# Altium PCB Owens Test Node.PcbDoc
Units mm, origin at the board's own origin, x right, y up, seen from the top; angles counter-clockwise.
Board outline 50.75 x 50 mm, 4 copper layers (Top Layer, GND, 3.3V, Bottom Layer), stack 0.603 mm thick; 21 components, 22 nets, 80 pads, 21 vias.
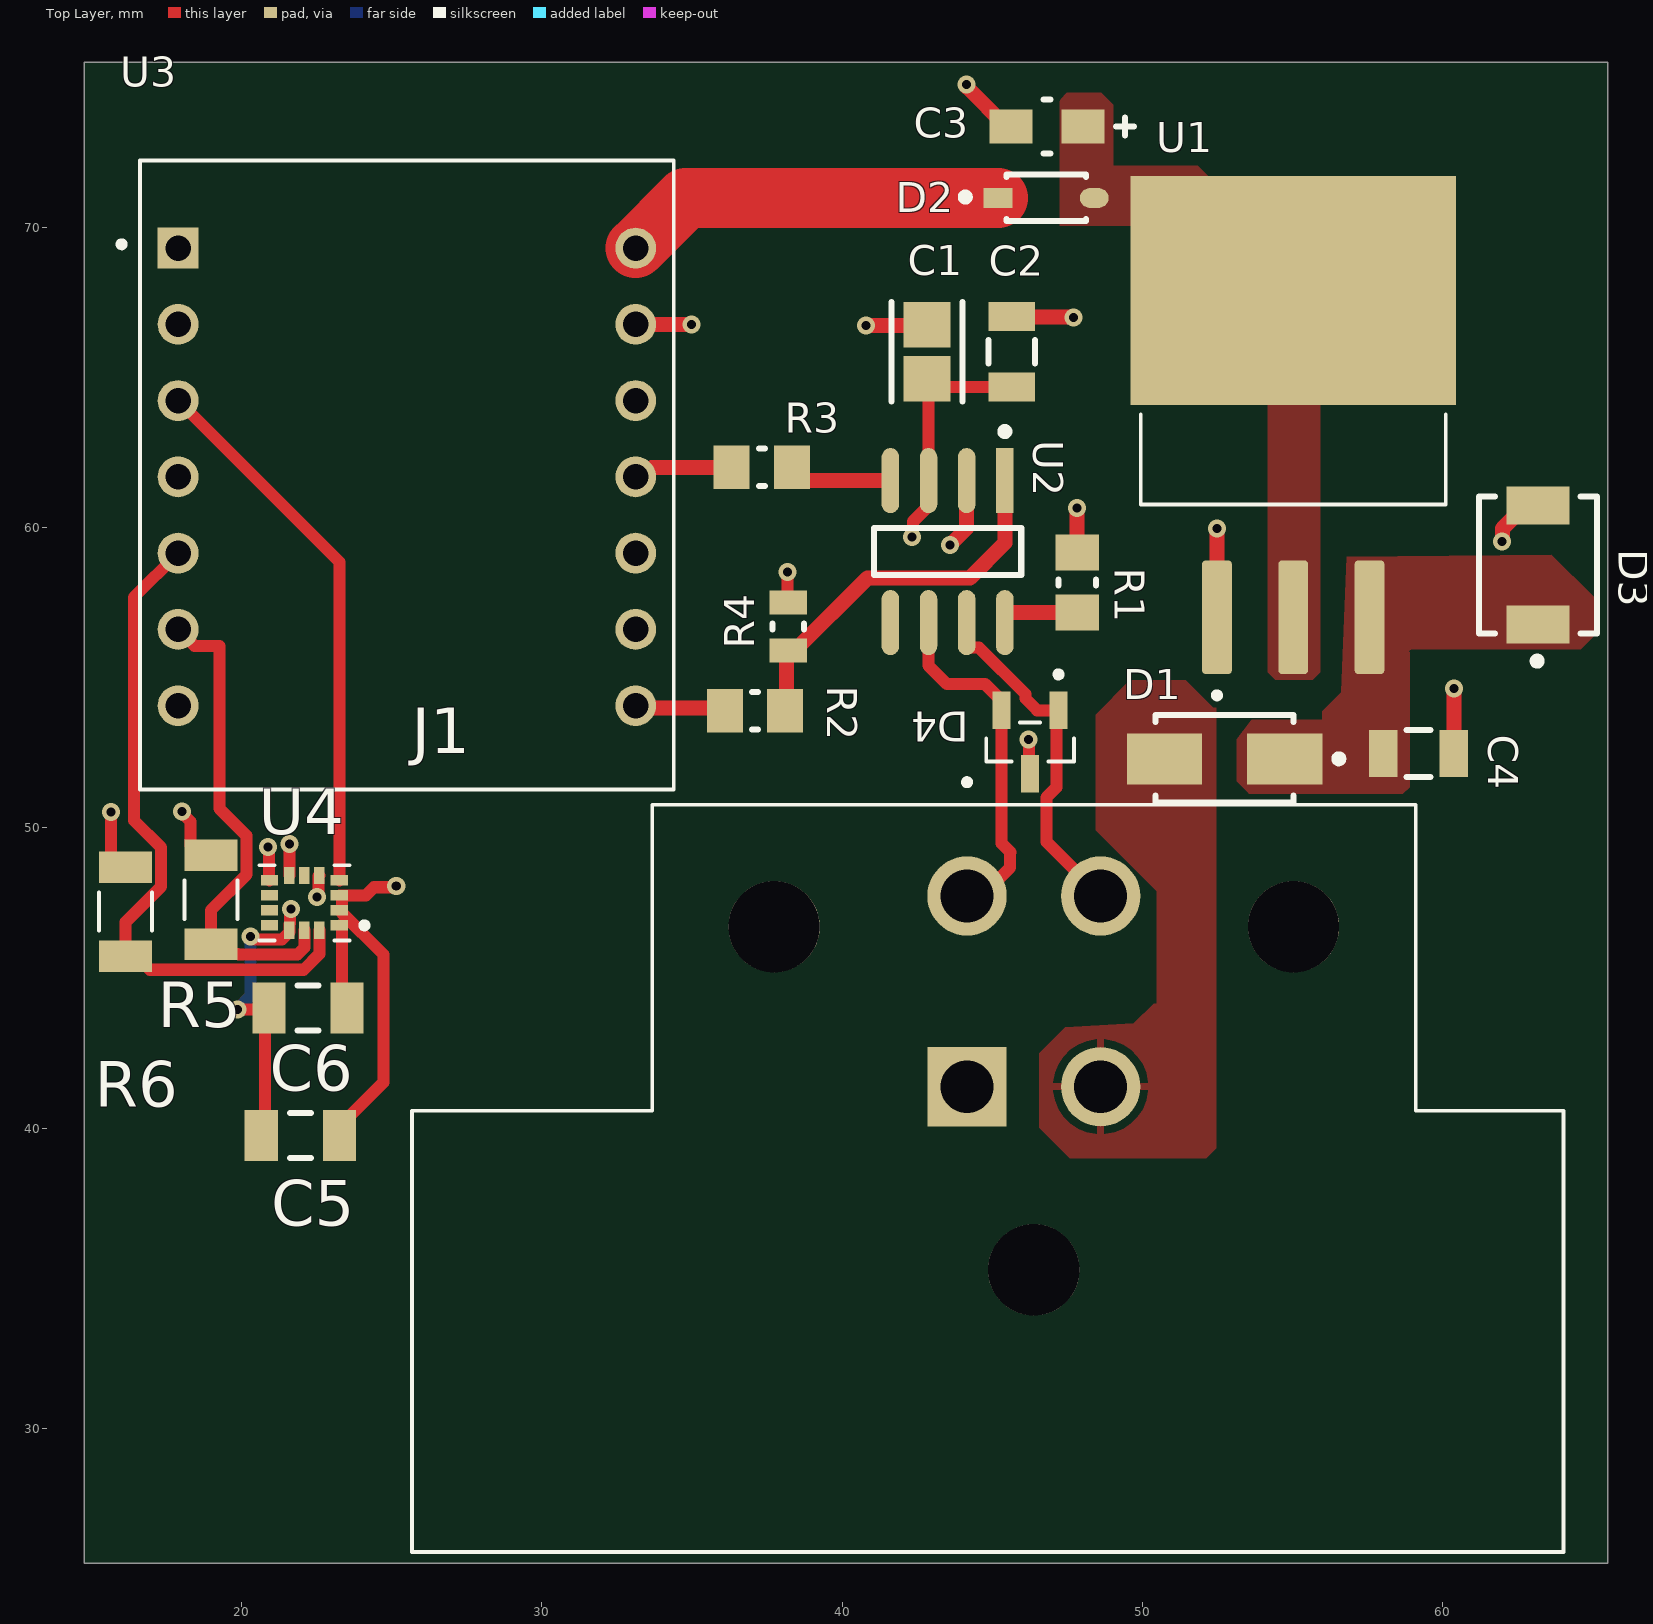
[diagram p0: Top Layer view]
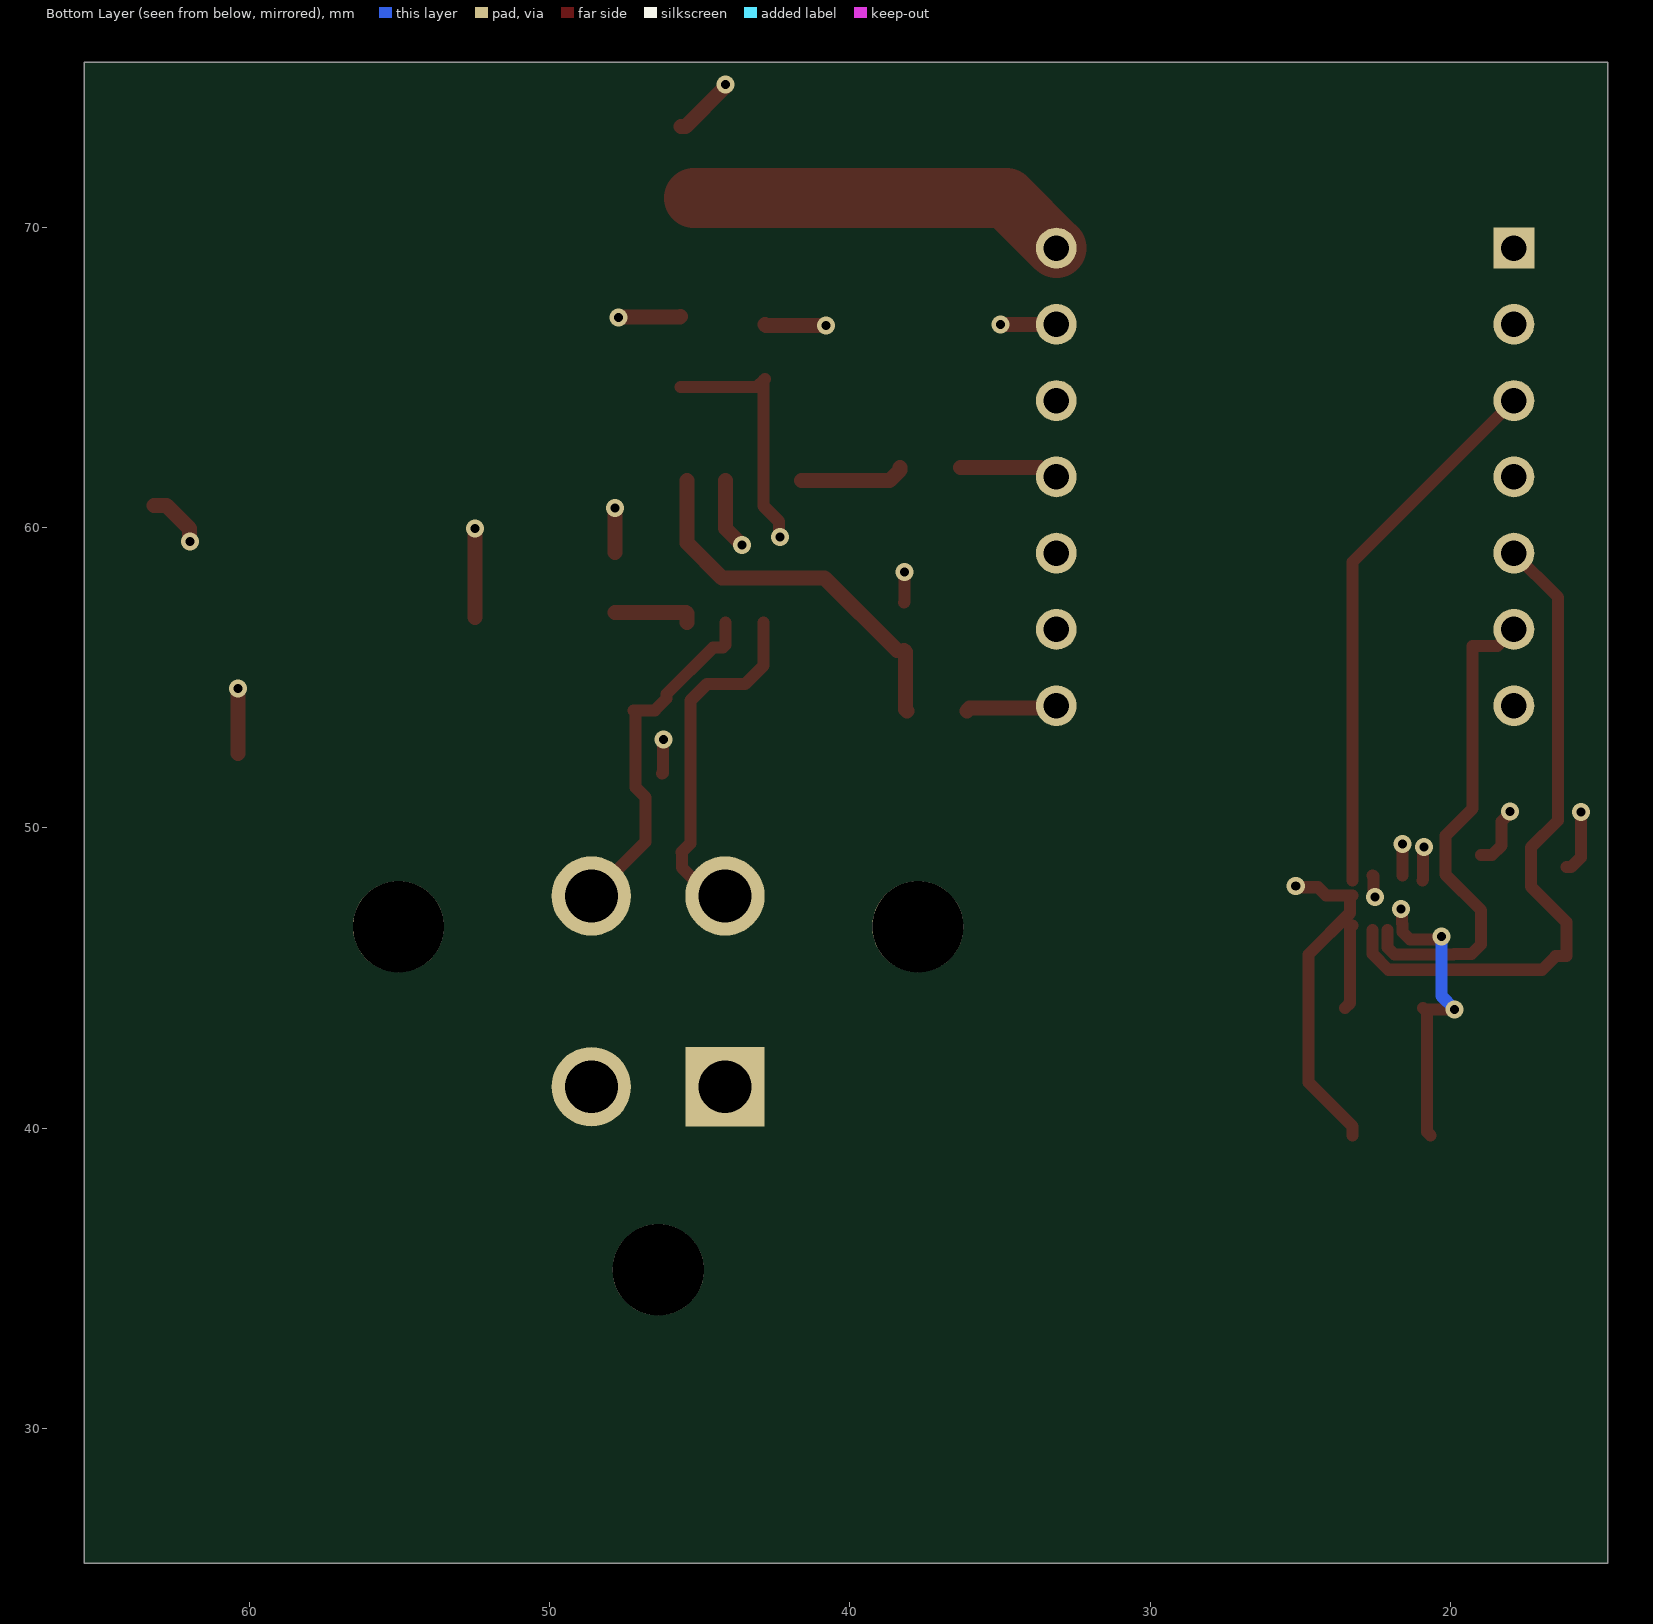
[diagram p1: Bottom Layer view, seen from below]
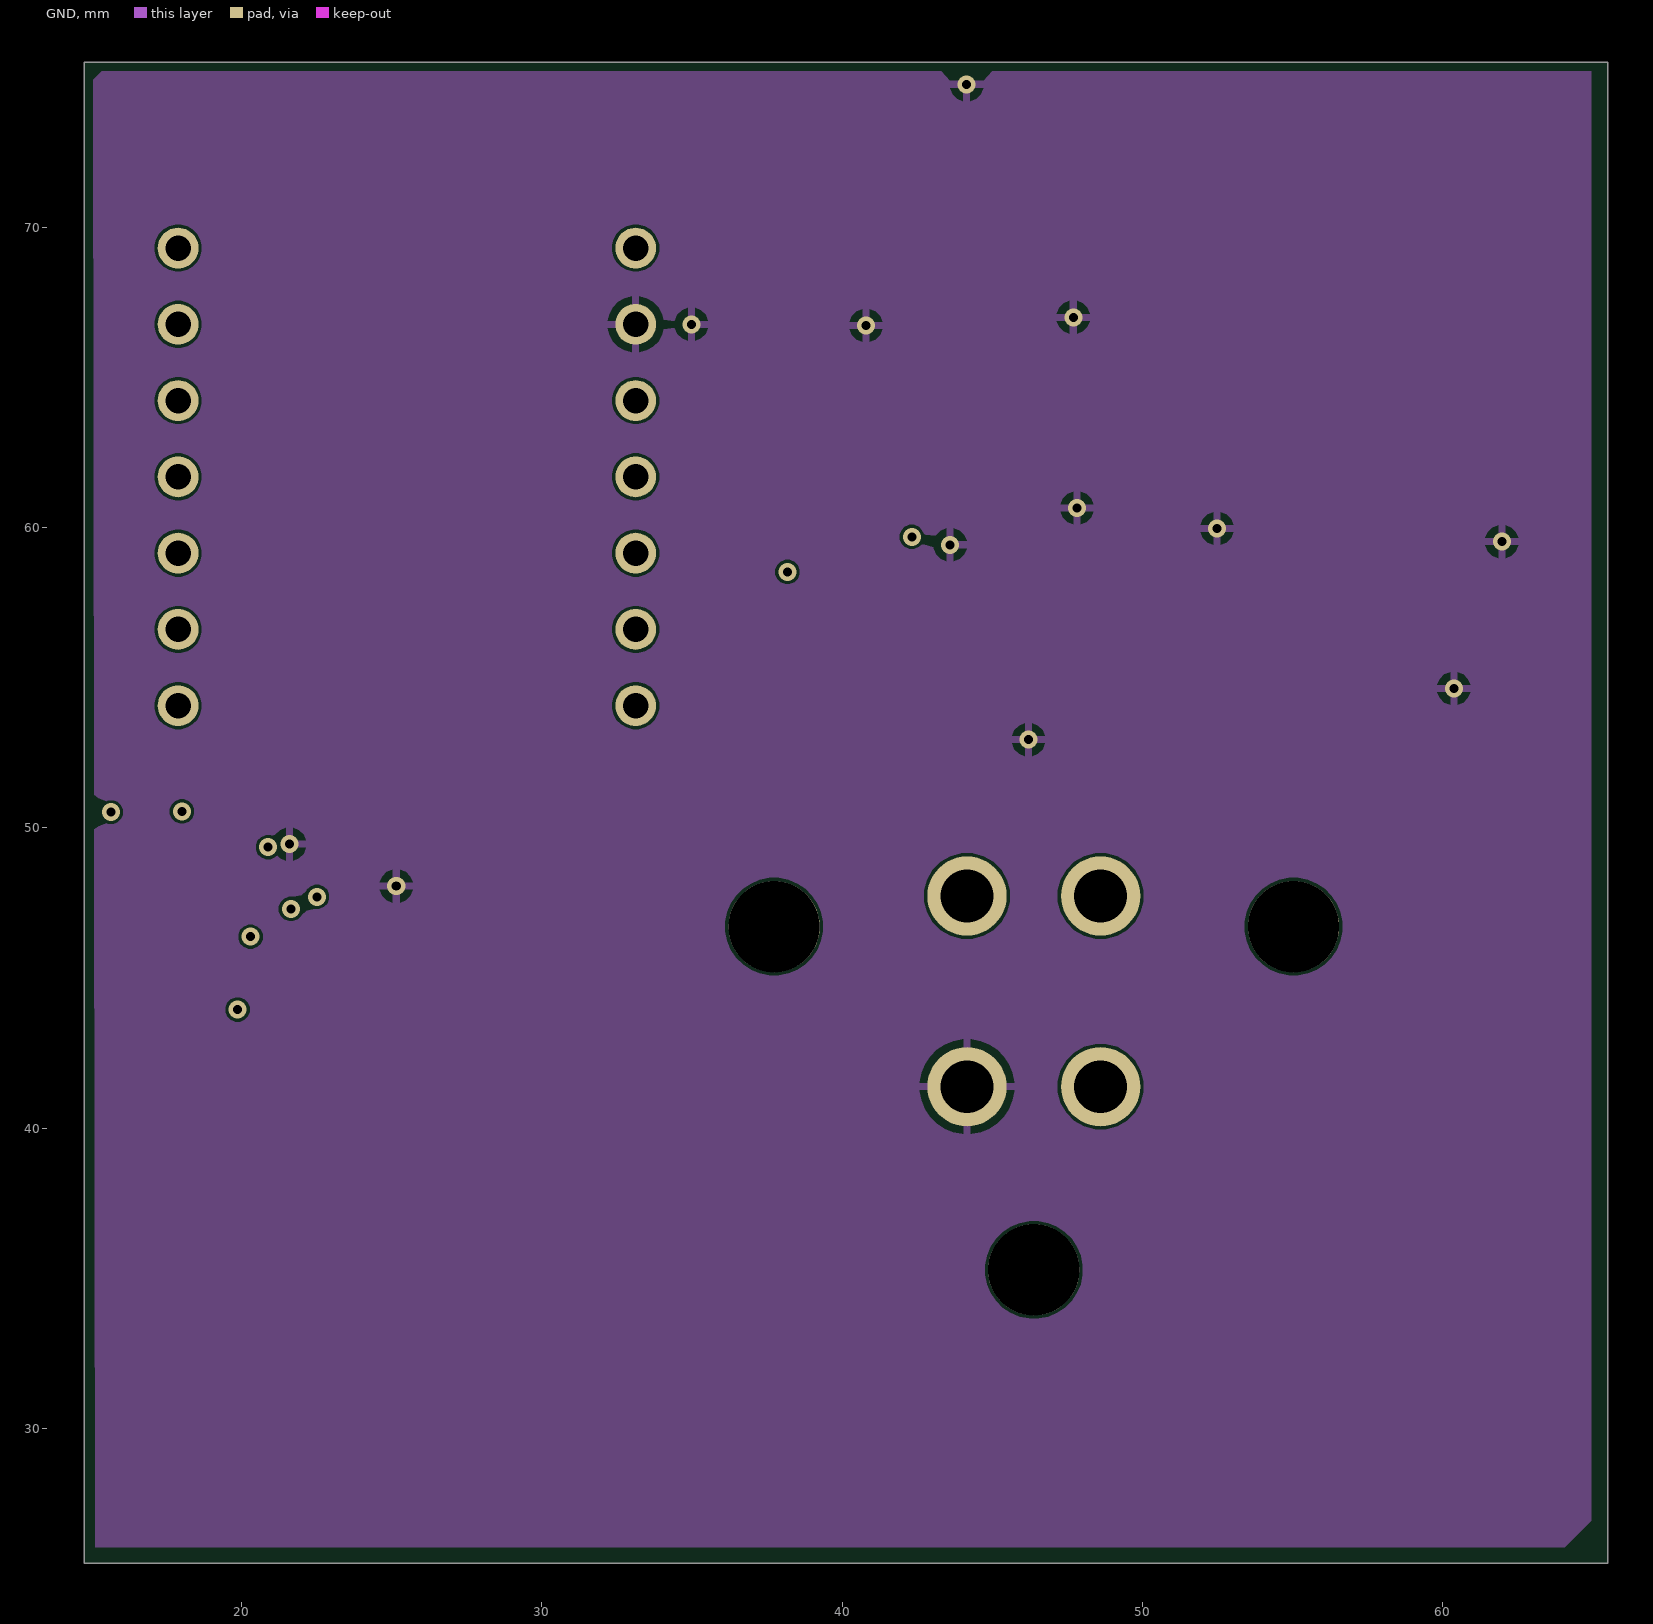
[diagram p2: GND]
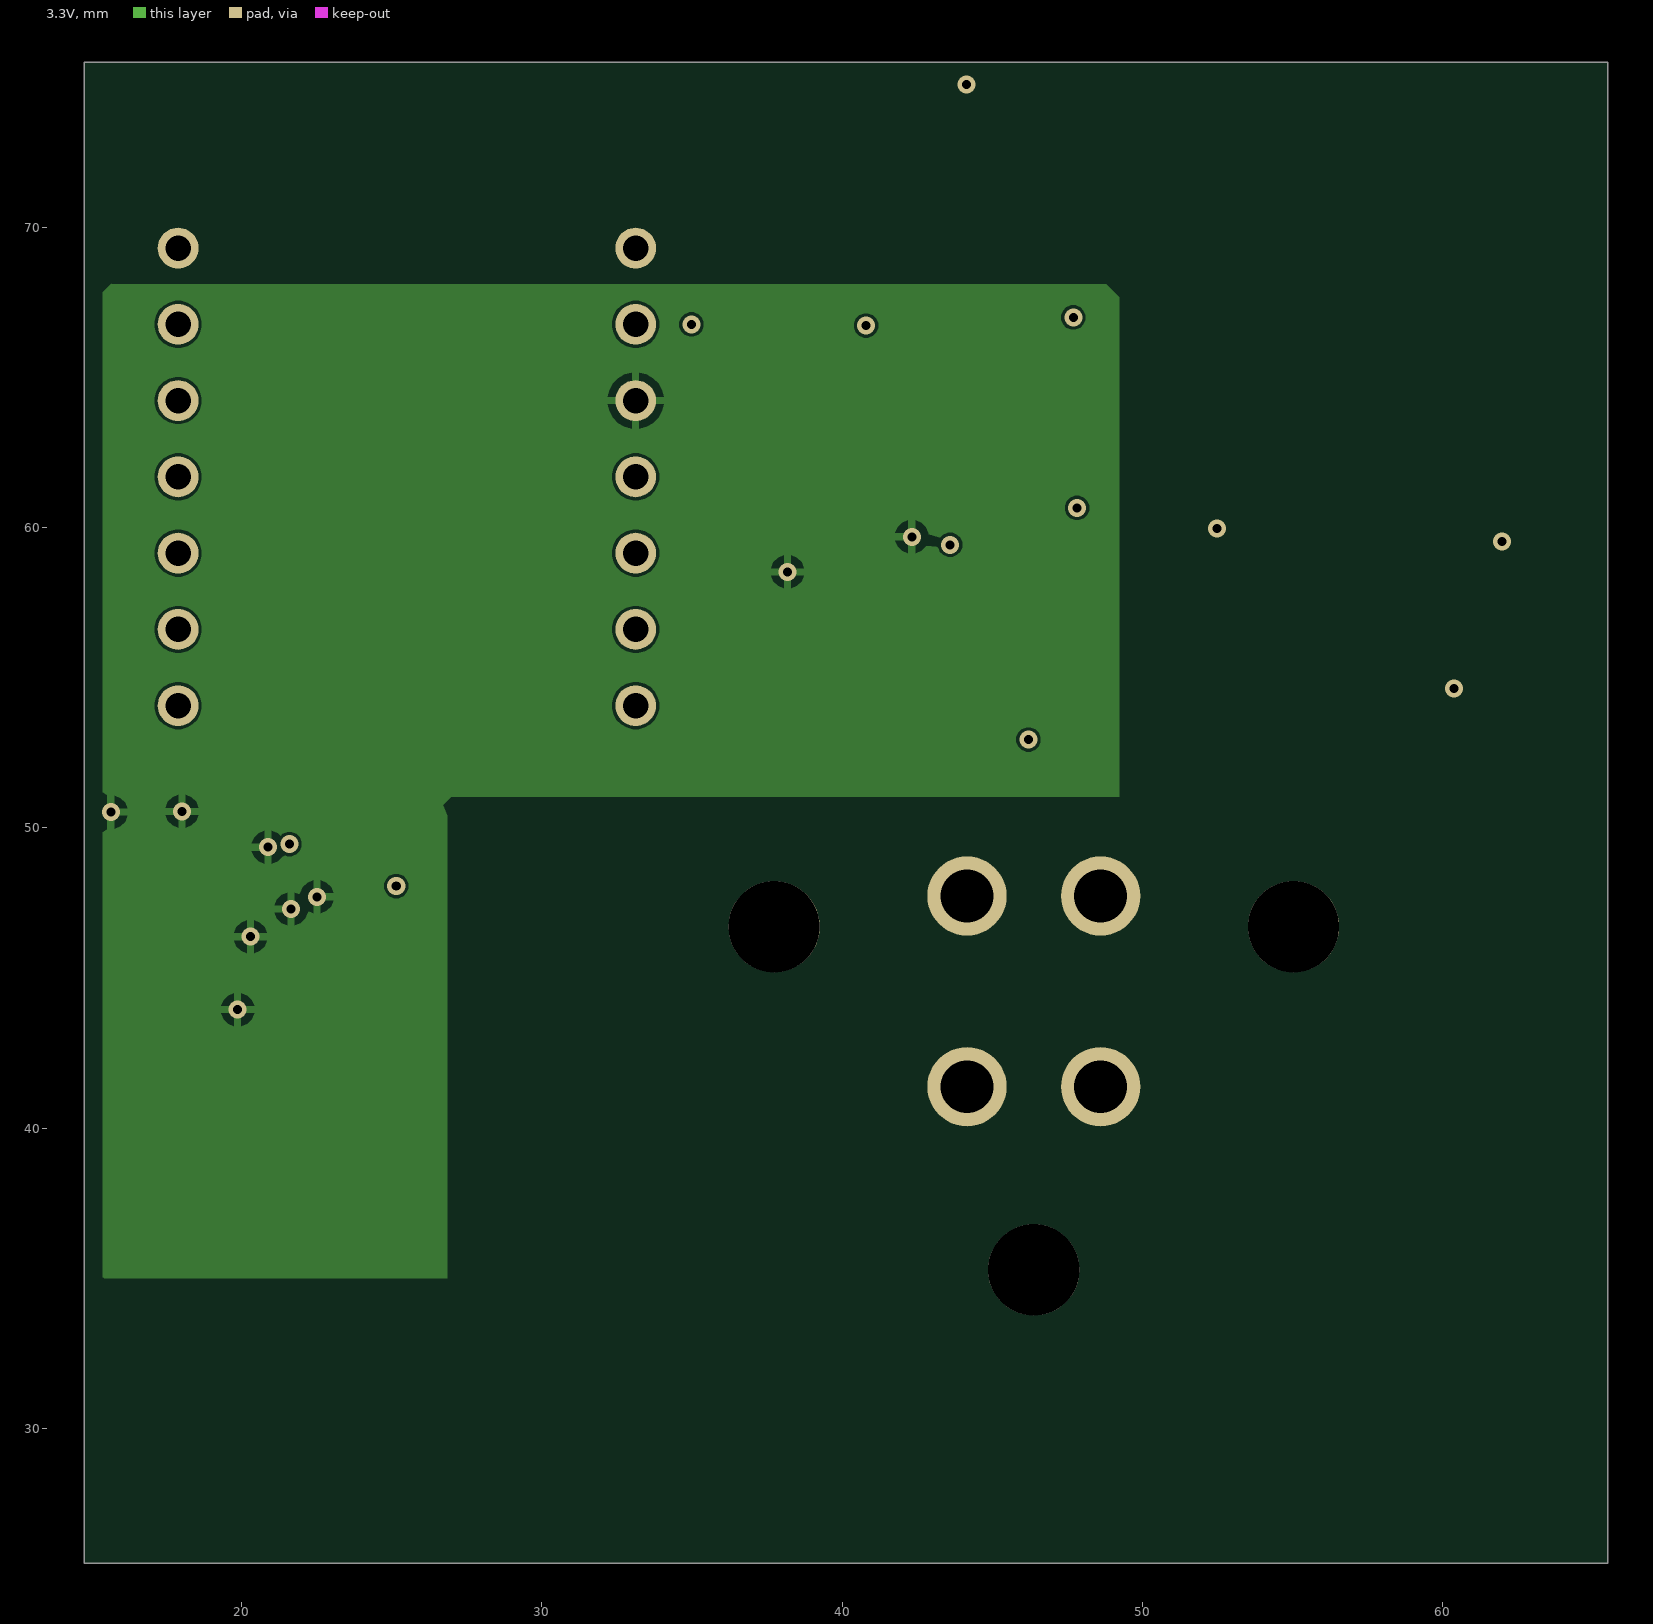
[diagram p3: 3.3V]
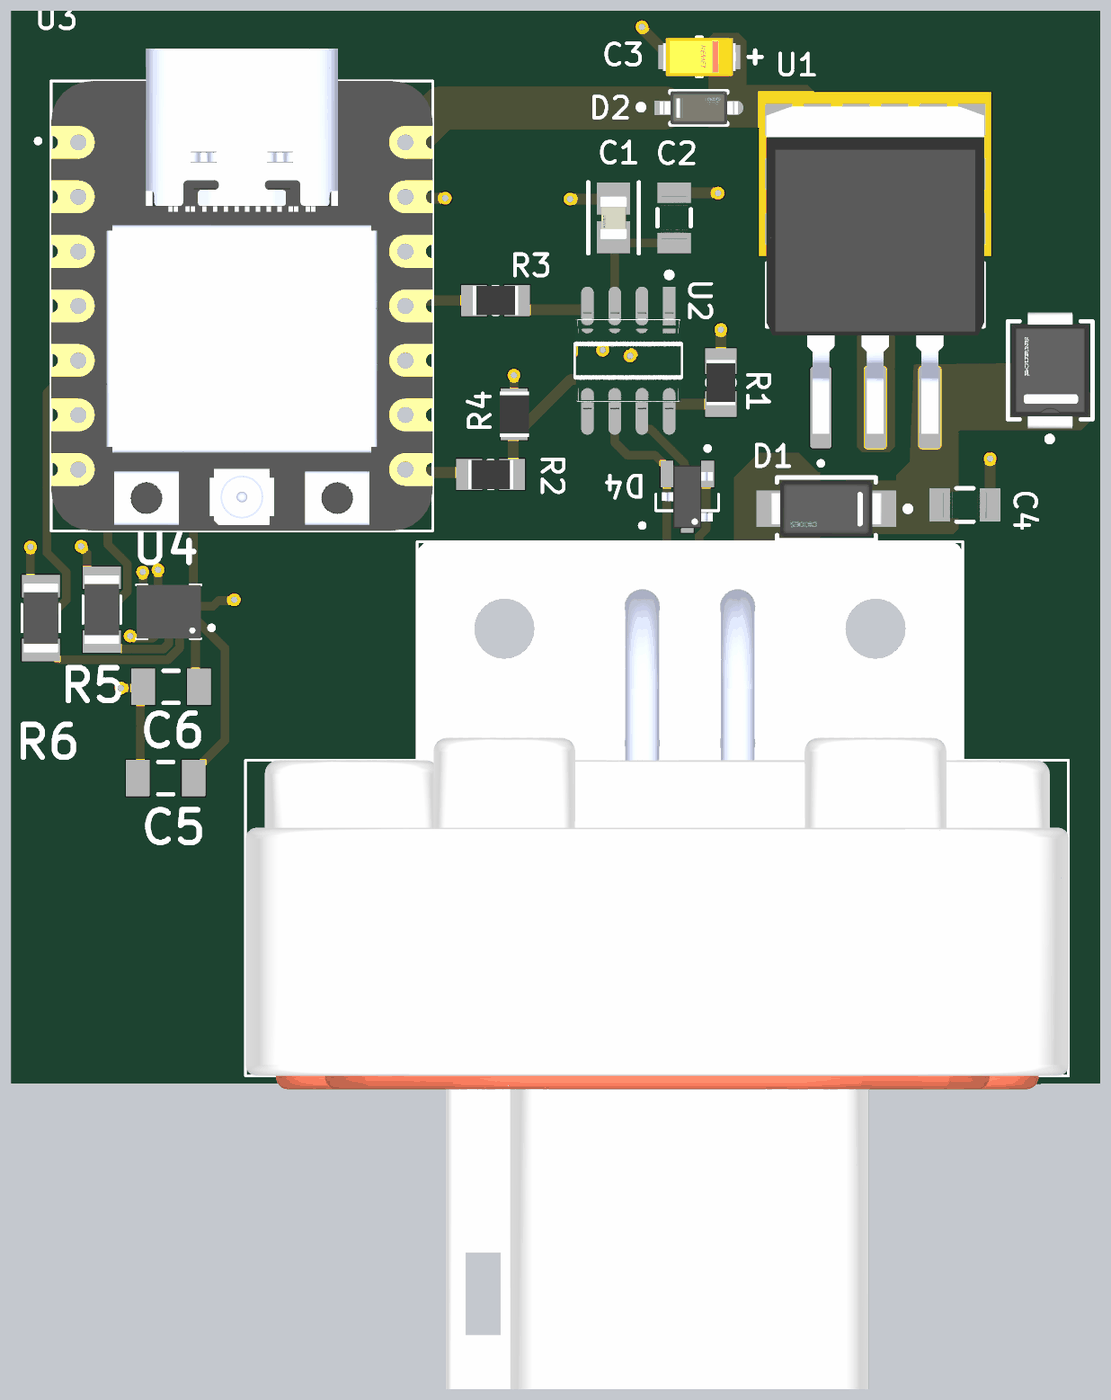
[diagram p4: 3D render of the assembled board from above, using the file's embedded part models]

## Layer stack, top to bottom
Top Solder: solder mask 0.0102, Solder Resist, Dk 3.5
Top Layer: signal copper 0.0356
Dielectric 2: prepreg 0.0711, PP-006, Dk 4.1
GND: signal copper 0.035
Dielectric 1: dielectric 0.32, FR-4, Dk 4.8
3.3V: signal copper 0.035
Dielectric 3: prepreg 0.0711, PP-006, Dk 4.1
Bottom Layer: signal copper 0.0356
Bottom Solder: solder mask 0.0102, Solder Resist, Dk 3.5

## Board outline
14.75,25.5 14.75,75.5 65.5,75.5 65.5,25.5

## Design rules (kind name [scope] priority, off if disabled: settings)
BoardOutlineClearance [All] p1: gap=0.3 ignorepadtopadclearanceinfootprint=FALSE
Clearance [All] p1: gap=0.1 ignorepadtopadclearanceinfootprint=FALSE
HoleSize [All] p1: absolutevalues=TRUE maxlimit=6.3 minlimit=0.3 maxpercent=80.000 minpercent=20.000
MinimumAnnularRing [All] p1: minimumring=0.13
MinimumSolderMaskSliver [All] p1: minsoldermaskwidth=0.2
PolygonConnect [All] p1: thpad.connectstyle=Relief thpad.reliefconductorwidth=0.254 thpad.reliefentries=4 thpad.polygonreliefangle="90 Angle" thpad.airgapwidth=0.254 smdpad.connectstyle=Direct smdpad.reliefconductorwidth=0.254 smdpad.reliefentries=4 smdpad.polygonreliefangle="90 Angle" smdpad.airgapwidth=0.254 via.connectstyle=Relief via.reliefconductorwidth=0.254 via.reliefentries=4 via.polygonreliefangle="90 Angle" via.airgapwidth=0.254
RoutingVias [All] p1: holewidth=0.3 width=0.6 viastyle="Through Hole" minholewidth=0.3 minwidth=0.6 maxholewidth=0.3 maxwidth=0.6
SilkToSilkClearance [All] p1: silktosilkclearance=0.15
SilkToSolderMaskClearance [IsPad] p1: minsilkscreentomaskgap=0.05 clearancetoexposedcopper=TRUE
SolderMaskExpansion [All] p1: expansion=0.05 istentingtop=FALSE
SupplyNets "Schematic Supply Nets_3" [InNet('+12')] p1: voltage=0.000
SupplyNets "Schematic Supply Nets_2" [InNet('+3.3')] p2: voltage=0.000
SupplyNets "Schematic Supply Nets_1" [InNet('GND')] p3: voltage=0.000
SupplyNets "Schematic Supply Nets" [InNet('+5')] p4: voltage=0.000
Width Power [All] p1: maxlimit=2 minlimit=0.4 preferedwidth=0.5
Width [All] p2: maxlimit=2 minlimit=0.09 preferedwidth=0.25
26 further rules are at their usual default settings.

## Classes and differential pairs
component class U_Sheet1: C1 C2 C3 C4 D1 D2 D3 D4 R1 R2 R3 R4 U1 U2 U3
component class U_Accel: C5 C6 R5 R6 U4
component class "Owens Test Node": J1

## Components (designator, comment, footprint, x,y, rotation, side; value= is the part's Value field where it differs from the comment)
C1 "C0805C104K5RACTU" FP-C0805C-DN-IPC_A 42.819,65.853 r90 top value=100nF
C2 "CGA4J1X7S1E106K125AE" FP-CGA4J-IPC_A 45.644,65.853 r90 top value=10µF
C3 "T491A106K016AT" FP-T491A106K016AT-MFG 46.819,73.35 r0 top value=10µF
C4 "CGA4J1X7S1E106K125AE" FP-CGA4J-IPC_A 59.194,52.475 r0 top value=10µF
C5 "C1206C104K5RACTU" KEMT-1206-2_L 21.95,39.75 r0 top value=100nF
C6 "C1206C104K5RACTU" KEMT-1206-2_L 22.2,44 r0 top value=100nF
D1 "B340A-13-F" FP-SMA-MFG 52.737,52.296 r180 top
D2 "1N5819HW-7-F" FP-SOD123-IPC_C 46.792,70.975 r0 top
D3 "SMBJ15A" FP-SMBJ-MFG 63.169,58.75 r90 top
D4 "ESD2CAN24DBZRQ1" SOT95P237X112-3N 46.253,52.857 r270 top
J1 "DT13-4P" TE_DT13-4P 46.38,41.377 r90 top
R1 "Resistor 0R +/- 5% 0805 125 mW" RESC2013X60X35ML10T20 47.821,58.175 r270 top value=0
R2 "Resistor 0R +/- 5% 0805 125 mW" RESC2013X60X35ML10T20 37.094,53.896 r0 top value=0
R3 "Resistor 0R +/- 5% 0805 125 mW" RESC2013X60X35ML10T20 37.319,62 r0 top value=0
R4 "RC0805FR-0710KL" RESC2013X60X35LL10T20 38.194,56.7 r90 top value=10k
R5 "RCS120610K0FKEA" RESC3116X65N 18.974,47.6 r90 top value=10k
R6 "RCS120610K0FKEA" RESC3116X65N 16.129,47.207 r90 top value=10k
U1 "LM1084ISX-5.0/NOPB" TO254P1524X483-4N 55.02,63.411 r90 top
U2 "SN65HVD230DR" FP-D0008A-IPC_B 43.509,59.197 r270 top
U3 "XIAO_ESP32C3" MODULE_XIAO_ESP32C3 25.5,61.75 r0 top
U4 "ASM330LHHXTR" XDCR_ASM330LHHXTR 22.087,47.5 r180 top

## Footprints (in the part's own frame and the unit in brackets; to place one, negate y for a bottom-side part, rotate by r counter-clockwise, add the part's x,y. Pads: shape width x height; smd on the part's side, far side on the other; paste and mask are expansions set on the pad)
FP-C0805C-DN-IPC_A [mm]
  rect 1.505x1.556 smd paste+0 mask+0: 1(-0.901,0) 2(0.901,0)
  silkscreen extent -1.65,-1.18 1.65,1.18, body extent -2.15,-1.28 2.15,1.28, height 0.25
FP-CGA4J-IPC_A [mm]
  rect 0.956x1.556 smd paste+0 mask+0: 1(-1.175,0) 2(1.175,0)
  silkscreen extent -0.4,-0.78 0.4,0.78, body extent -2.15,-1.28 2.15,1.28, height 0.25
FP-D0008A-IPC_B [mm]
  rect 2.169x0.582 smd paste+0 mask+0: 1(-2.364,1.905)
  rrect100% 2.169x0.582 smd paste+0 mask+0: 2(-2.364,0.635) 3(-2.364,-0.635) 4(-2.364,-1.905) 5(2.364,-1.905) 6(2.364,-0.635) 7(2.364,0.635) 8(2.364,1.905)
  silkscreen extent -4.12,-2.45 0.78,2.45, body extent -3.7,-2.7 3.7,2.7, height 0.25
FP-SMA-MFG [mm]
  rect 2.5x1.7 smd paste+0 mask+0: 1(-2,0) 2(2,0)
  silkscreen extent -3.93,-1.46 2.3,1.46, body extent -3.35,-1.56 3.35,1.56, height 0.25
FP-SMBJ-MFG [mm]
  rect 1.27x2.1 smd paste+0 mask+0: 1(-1.98,0) 2(1.98,0)
  silkscreen extent -3.32,-1.97 2.28,1.97, body extent -2.72,-2.07 2.72,2.07, height 0.25
FP-SOD123-IPC_C [mm]
  rect 0.957x0.662 smd paste+0 mask+0: 1(-1.6,0)
  rrect100% 0.957x0.662 smd paste+0 mask+0: 2(1.6,0)
  silkscreen extent -2.82,-0.77 1.33,0.77, body extent -2.18,-0.87 2.18,0.87, height 0.25
FP-T491A106K016AT-MFG [mm]
  rect 1.42x1.13 smd paste+0 mask+0: 1(-1.2,0) 2(1.2,0)
  silkscreen extent -0.12,-0.9 2.9,0.9, body extent -2.03,-1.02 2.03,1.02, height 0.25
KEMT-1206-2_L [mm] "SMD, 2-Leads, Body 3.4x1.8mm, IPC High Density"
  rect 1.1x1.7 smd: 1(-1.3,0) 2(1.3,0)
  silkscreen extent -0.35,-0.75 0.35,0.75, body extent -1.7,-0.9 1.7,0.9, height 0.88
MODULE_XIAO_ESP32C3 [mm]
  rect 1.358x1.358 / inner round 1.358 / far side rect 1.358x1.358 hole 0.85 mask+0.102: 1(-7.62,7.556)
  round 1.358 hole 0.85 mask+0.102: 2(-7.62,5.016) 3(-7.62,2.476) 4(-7.62,-0.064) 5(-7.62,-2.603) 6(-7.62,-5.143) 7(-7.62,-7.683) 8(7.62,-7.683) 9(7.62,-5.143) 10(7.62,-2.603) 11(7.62,-0.064) 12(7.62,2.476) 13(7.62,5.016) 14(7.62,7.556)
  silkscreen extent -9.6,-10.48 8.89,10.48, body extent -8.89,-10.48 8.89,11.99, height 4.21
RESC2013X60X35LL10T20 [mm] "Chip Resistor, 2-Leads, Body 2.1x1.35mm, IPC High Density"
  rect 0.8x1.25 smd: 1(-0.8,0) 2(0.8,0)
  silkscreen extent -0.1,-0.53 0.1,0.53, body extent -1.05,-0.67 1.05,0.68, height 0.6
RESC2013X60X35ML10T20 [mm] "Chip Resistor, 2-Leads, Body 2.1x1.35mm, IPC Low Density"
  rect 1.2x1.45 smd: 1(-1,0) 2(1,0)
  silkscreen extent -0.1,-0.63 0.1,0.63, body extent -1.05,-0.68 1.05,0.67, height 0.6
RESC3116X65N [mm]
  rect 1.05x1.77 smd: 1(-1.485,0) 2(1.485,0)
  silkscreen extent -0.64,-0.88 0.64,0.88, body extent -1.6,-0.8 1.6,0.8, height 0.65
SOT95P237X112-3N [mm]
  rect 1.24x0.59 smd: 1(-1.055,0.95) 2(-1.055,-0.95) 3(1.055,0)
  silkscreen extent -2.35,-1.46 0.65,1.46, body extent -1.18,-1.46 1.18,1.46, height 1.12
TE_DT13-4P [mm]
  round 2.64 hole 1.76: 1(6.35,2.225) 2(6.35,-2.225) 3(0,-2.225)
  rect 2.64x2.64 / inner round 2.64 / far side rect 2.64x2.64 hole 1.76: 4(0,2.225)
  round 3.04 hole 3.04 unplated: MH1(5.33,8.65) MH2(5.33,-8.65) MH3(-6.1,0)
  silkscreen extent -15.5,-17.64 10.24,20.71, body extent -30.1,-17.65 9.4,20.7, height 35.48
TO254P1524X483-4N [mm]
  rrect25% 3.79x0.99 smd: 1(-6.4,2.54) 2(-6.4,0) 3(-6.4,-2.54)
  rect 7.62x10.84 smd paste-6: 4(4.48,0)
  silkscreen extent -9.1,-5.08 0.35,5.08, body extent -7.62,-5.08 7.62,5.08, height 4.83
XDCR_ASM330LHHXTR [mm]
  rect 0.575x0.35 smd mask+0.05: 1(-1.162,0.75) 2(-1.162,0.25) 3(-1.162,-0.25) 4(-1.162,-0.75) 8(1.162,-0.75) 9(1.162,-0.25) 10(1.162,0.25) 11(1.162,0.75)
  rect 0.35x0.575 smd mask+0.05: 5(-0.5,-0.913) 6(0,-0.913) 7(0.5,-0.913) 12(0.5,0.913) 13(0,0.913) 14(-0.5,0.913)
  silkscreen extent -2.1,-1.25 1.5,1.25, body extent -1.5,-1.25 1.5,1.25, height 0.86

## Part data
C1: library part CMP-001-00126-1, "50V 100nF X7R ±10% 0805 Multilayer Ceramic Capacitors MLCC - SMD/SMT ROHS", Case/Package=0805, Max Operating Temperature=125°C, Min Operating Temperature=-55°C, Tolerance=10%, Voltage Rating=50V, Mounting Technology="Surface Mount", Pins=2
C2 C4: library part CMP-001-00125-1, "25V 10uF X7S 卤10% 0805 Multilayer Ceramic Capacitors MLCC - SMD/SMT ROHS", Case/Package=0805, Max Operating Temperature=125°C, Min Operating Temperature=-55°C, Tolerance=10%, Voltage Rating=25V, Mounting Technology="Surface Mount"
C3: library part CMP-001-00127-1, "Cap Tant Solid 10uF 16V A CASE 10% (3.2 X 1.6 X 1.6mm) Inward L SMD 3216-18 3 Ohm 125C T/R", Case/Package=1206, Max Operating Temperature=125°C, Min Operating Temperature=-55°C, Ripple Current=63mA, Tolerance=10%, Voltage Rating=16V, Mounting Technology="Surface Mount", Pins=2
C5 C6: library part CMP-001-00131-1, "Multilayer Ceramic Capacitors MLCC – SMD/SMT; KEMET; C1206C104K5RACTU; 100 nF; 1206; 50 V; 50 V", Case/Package=1206, Max Operating Temperature=125°C, Min Operating Temperature=-55°C, Tolerance=10%, Voltage Rating=50V, Mounting Technology="Surface Mount", Pins=2
D1: library part CMP-004-00039-1, "Rectifier Diode, Schottky, 1 Phase, 1 Element, 3A, 40V V(RRM), Silicon, DO-214AC", Case/Package=SMA, Forward Current=3A, Forward Voltage=500mV, Max Operating Temperature=150°C, Min Operating Temperature=-55°C, Mounting Technology="Surface Mount", Pins=2
D2: library part CMP-004-00040-1, "1N5819HW Series 40 V 1 A Surface Mount Schottky Barrier Rectifier - SOD-123", Case/Package=SOD-123-2, Forward Current=1A, Forward Voltage=750mV, Max Operating Temperature=125°C, Min Operating Temperature=-65°C, Pins=2
D3: library part CMP-004-00044-1, "TVS Diode, SMBJ, Unidirectional, 15 V, 24.4 V, DO-214AA (SMB), 2 Pins", Case/Package=SMB, Max Operating Temperature=150°C, Max Surge Current=100A, Min Operating Temperature=-55°C, Mounting Technology="Surface Mount", Pins=2
D4: library part CMP-004-00043-1, "Automotive, dual, 3-pF, ±24-V, ±30-kV ESD protection diode for in-vehicle networks", Case/Package="SOT-23 Texas Instruments", Check_prices=https://www.snapeda.com/parts/ESD2CAN24DBZRQ1/Texas+Instruments/view-part/?ref=eda, Component Type=Standard, Design Item ID=ESD2CAN24DBZRQ1, MF="Texas Instruments", MP=ESD2CAN24DBZRQ1, Pins=3, SnapEDA_Link=https://www.snapeda.com/parts/ESD2CAN24DBZRQ1/Texas+Instruments/view-part/?ref=snap, Source=ESD2CAN24DBZRQ1.SchLib
J1: library part CMP-002-00095-3, "DT13 Series 4.44mm Pitch 4 Way 2 Row Right Angle PCB Header Solder Termination", Case/Package=None, Check_prices=https://www.snapeda.com/parts/DT13-4P/TE+Connectivity+%252F+DEUTSCH/view-part/?ref=eda, Component Type=Standard, Design Item ID=DT13-4P, EU_RoHS_Compliance=Compliant, MF="TE Connectivity", MP=DT13-4P, Pins=4, SnapEDA_Link=https://www.snapeda.com/parts/DT13-4P/TE+Connectivity+%252F+DEUTSCH/view-part/?ref=snap, Source=DT13-4P.SchLib
R1 R2 R3: library part CMP-009-00007-5, "Chip Resistor, 0 Ohm, 0.125 W, -55 to 155 degC, 0805 (2012 Metric)", Case/Package=0805, Max Operating Temperature=155°C, Min Operating Temperature=-55°C, Power=125mW, Tolerance=5%, Voltage Rating=50V, Mounting Technology=SM, Pins=2, RoHS Compliant=True
R4: library part CMP-009-00200-1, "10 kOhms ¡À1% 0.125W, 1/8W Chip Resistor 0805 (2012 Metric) Moisture Resistant Thick Film", Case/Package=0805, Max Operating Temperature=155°C, Min Operating Temperature=-55°C, Tolerance=1%, Voltage Rating=150V, Mounting Technology="Surface Mount", Pins=2
R5 R6: library part CMP-009-00195-1, "10 kOhms Â±1% 0.5W, 1/2W Chip Resistor 1206 (3216 Metric) Automotive AEC-Q200, Pulse Withstanding Thick Film", Case/Package="3116 Vishay", Check_prices=https://www.snapeda.com/parts/RCS120610K0FKEA/Vishay+Dale/view-part/?ref=eda, Component Type=Standard, Design Item ID=RCS120610K0FKEA, MF="Vishay Dale", MP=RCS120610K0FKEA, Pins=2, SnapEDA_Link=https://www.snapeda.com/parts/RCS120610K0FKEA/Vishay+Dale/view-part/?ref=snap, Source=RCS120610K0FKEA.SchLib
U1: library part CMP-059-000000-2, "5.5-A, 29-V, linear voltage regulator", Package="TO263-3 Texas Instruments", Check_prices=https://www.snapeda.com/parts/LM1084ISX-5.0/NOPB/Texas+Instruments/view-part/?ref=eda, Component Type=Standard, Design Item ID=LM1084ISX-5.0/NOPB, MF="Texas Instruments", MP=LM1084ISX-5.0/NOPB, Pin Count=4, SnapEDA_Link=https://www.snapeda.com/parts/LM1084ISX-5.0/NOPB/Texas+Instruments/view-part/?ref=snap, Source=LM1084ISX-5.0_NOPB.SchLib
U2: library part CMP-014-00002-1, "Texas Instruments CANTransceiver, 1Transceiver, Maximum data rate1Mbps, SOICencapsulation, 8Pin", Case/Package=SOIC, Max Operating Temperature=85°C, Max Supply Voltage=3.6V, Min Operating Temperature=-40°C, Min Supply Voltage=3V, Pins=8
U3: library part CMP-504-000000-1, "Dev.kit: evaluation; u.FL antenna,prototype board; XIAO; PIN: 2x7", Package=None, Check_prices=https://www.snapeda.com/parts/XIAO%20ESP32C3/Seeed+Studio/view-part/?ref=eda, Component Type=Standard, Design Item ID=XIAO_ESP32C3, MF="Seeed Studio", MP="XIAO ESP32C3", Pin Count=14, SnapEDA_Link=https://www.snapeda.com/parts/XIAO%20ESP32C3/Seeed+Studio/view-part/?ref=snap, Source=XIAO_ESP32C3.SchLib
U4: library part CMP-522-000000-1, "Accelerometer, Gyroscope, Temperature, 6 Axis Sensor IÂ²C, I3Câ„ , SPI Output", Package="VFLGA-14 STMicroelectronics", Check_prices=https://www.snapeda.com/parts/ASM330LHHXTR/STMicroelectronics/view-part/?ref=eda, Component Type=Standard, Design Item ID=ASM330LHHXTR, MF=STMicroelectronics, MP=ASM330LHHXTR, Pin Count=14, SnapEDA_Link=https://www.snapeda.com/parts/ASM330LHHXTR/STMicroelectronics/view-part/?ref=snap, Source=ASM330LHHXTR.SchLib

## Via types
v1: diameter 0.6, hole 0.3, Top Layer to Bottom Layer, 21 vias

## Nets (pads, with @x,y where several pads share a name; then routed paths per layer and width w, separated by ;. In a path a pad name is that pad's centre, name@x,y a point inside that pad or via, vN(x,y) a via of type N, cw(c..) or ccw(c..) an arc to the next point about the centre after c; other vN are vias at no path point)
+3.3: C1.1 C2.1 C5.1 C6.1 R4.2 R5.2 R6.2 U2.3 U3.12 U4.5 U4.8 U4.12 | length 25.8
  Top Layer w0.4: v1(15.646,50.521) 15.646,49.017 15.971,48.692 R6.2 ; v1(18.009,50.546) 18.009,50.492 18.289,50.212 18.289,49.41 18.614,49.085 R5.2 ; v1(19.863,43.942) 20.842,43.942 C6.1 20.775,43.875 20.775,39.875 C5.1 ; v1(20.294,46.371) 20.348,46.371 20.443,46.275 21.338,46.275 21.588,46.525 U4.12 21.588,46.795 21.603,46.81 21.603,47.257 v1(21.641,47.295) ; v1(20.879,49.352) 20.902,49.329 20.902,48.273 U4.8 ; v1(22.504,47.701) 22.504,47.755 22.562,47.813 22.562,48.388 U4.5 ; v1(38.176,58.522) 38.176,57.518 R4.2 ; v1(42.316,59.69) 42.355,59.728 42.355,60.199 42.874,60.718 U2.3 42.874,64.897 C1.1 43.093,64.678 C2.1
  Bottom Layer w0.4: v1(19.863,43.942) 19.863,43.967 20.294,44.398 v1(20.294,46.371)
+5: D2.1 U3.14 | length 12.8
  Top Layer w2: U3.14 34.789,70.975 D2.1
+5V_REG: C3.2 D2.2 U1.2 U1.4
+12: D1.2 J1.3
+12V_PROT: C4.1 D1.1 D3.1 U1.3
CAN_RX: R3.2 U2.4 | length 3.5
  Top Layer w0.5: R3.2 38.319,61.911 38.669,61.561 U2.4
CAN_TX: R2.2 R4.1 U2.1 | length 12.6
  Top Layer w0.5: R2.2 38.144,53.946 38.144,55.85 R4.1 ; R4.1@38.419,55.9 40.838,58.318 44.253,58.318 45.414,59.48 U2.1
CANH: D4.1 J1.2 U2.7 | length 11.9
  Top Layer w0.4: U2.7 44.144,56.09 44.228,56.005 44.55,56.005 46.108,54.447 46.108,54.298 46.494,53.912 D4.1 47.132,53.841 47.132,51.341 46.803,51.012 46.803,49.529 J1.2
CANL: D4.2 J1.1 U2.6 | length 11.9
  Top Layer w0.4: U2.6 42.874,55.398 43.485,54.788 44.753,54.788 45.303,54.237 45.303,49.483 45.603,49.184 45.59,49.171 45.59,48.676 45.069,48.155 44.584,48.155 J1.1
GND: C1.2 C2.2 C3.1 C4.2 C5.2 C6.2 D3.2 D4.3 J1.4 R1.1 U1.1 U2.2 U3.13 U4.1 U4.2 U4.3 U4.7 | length 35.2
  Top Layer w0.4: U4.7 21.589,48.414 v1(21.59,49.454) v1(21.59,49.454) ; C5.2 23.25,40.05 24.714,41.514 24.714,45.786 23.337,47.162 23.337,47.725 23.313,47.75 U4.3 ; U4.1 23.313,46.75 23.337,46.725 23.337,44.163 C6.2 ; U4.3@23.337,47.751 24.137,47.751 24.405,48.019 25.108,48.019 v1(25.146,48.057) ; v1(46.203,52.934) 46.228,52.908 46.228,51.828 D4.3
  Top Layer w0.5: U3.13 v1(34.978,66.767) ; v1(40.793,66.726) 42.791,66.726 C1.2 ; v1(43.594,59.425) 44.144,59.975 U2.2 ; v1(44.144,74.75) 44.163,74.731 44.163,74.661 45.474,73.35 C3.1 ; C2.2 45.658,67.014 47.68,67.014 v1(47.694,67) ; R1.1@47.82,59.176 v1@47.82,60.649 ; U1.1 v1(52.48,59.964) ; C4.2 v1(60.369,54.639) ; v1(61.969,59.53) 61.988,59.549 61.988,59.964 62.754,60.73 D3.2
  other v1: 47.819,60.65
NetR1_2: R1.2 U2.8 | length 2.7
  Top Layer w0.5: U2.8 45.414,57.137 45.452,57.175 R1.2
NetR2_1: R2.1 U3.8 | length 3
  Top Layer w0.5: U3.8 33.205,53.981 36.009,53.981 R2.1
NetR3_1: R3.1 U3.11 | length 3.3
  Top Layer w0.5: U3.11 33.352,61.687 33.666,62 R3.1
NetU3_1: U3.1
NetU3_2: U3.2
NetU3_3: U3.3 U4.4 | length 18.2
  Top Layer w0.4: U3.3 23.25,58.857 U4.4
NetU3_4: U3.4
NetU3_7: U3.7
NetU3_9: U3.9
NetU3_10: U3.10
SCL: R5.1 U3.6 U4.13 | length 16.3
  Top Layer w0.4: U3.6 18.429,56.058 19.253,56.058 19.253,50.639 20.159,49.734 20.159,48.435 18.974,47.25 R5.1 19.299,45.79 19.874,45.79 19.893,45.771 21.853,45.771 22.087,46.005 U4.13
SDA: R6.1 U3.5 U4.14 | length 22.6
  Top Layer w0.4: U3.5 16.408,57.675 16.408,50.247 17.314,49.341 17.314,48.043 16.129,46.858 R6.1 16.489,45.722 16.94,45.271 22.06,45.271 22.587,45.798 U4.14
pads on no net: J1.MH1 J1.MH2 J1.MH3 U2.5 U4.6 U4.9 U4.10 U4.11

## Polygon pours and split planes (outlines as drawn)
+12 on Top Layer "+12_L01_P012" (solid, pour order 12): 47.422,43.358 46.558,42.494 46.558,40.005 47.574,38.989 52.121,38.989 52.451,39.319 52.451,54 52.349,54 51.435,54.915 49.581,54.915 48.438,53.772 48.438,49.911 50.47,47.879 50.47,44.145 50.368,44.145 49.708,43.485
+5V_REG on Top Layer "+5V_REG_L01_P001" (solid, pour order 1): 54.669,54.925 55.669,54.925 55.919,55.175 55.919,68.675 55.419,69.175 54.169,69.175 54.169,55.175 54.419,54.925 54.919,54.925
+12V_PROT on Top Layer "+12V_PROT_L01_P006" (solid, pour order 6): 53.619,53.575 53.144,52.942 53.144,51.55 53.544,51.15 53.544,51.125 58.669,51.125 58.894,51.35 58.894,55.85 58.869,55.875 58.944,55.95 64.594,55.95 65.044,56.4 65.044,57.675 63.619,59.1 56.806,59.023 56.624,54.505 55.994,53.875 55.994,53.6 53.644,53.6
+5V_REG on Top Layer "+5V_REG_L01_P007" (solid, pour order 7): 47.294,74.275 47.244,74.2 47.244,70.05 51.944,70.05 52.044,69.95 52.569,70.475 52.569,71.5 52.394,71.5 51.844,72.05 49.019,72.05 49.019,74.075 48.619,74.475 47.469,74.475 47.444,74.45
GND on GND "GND_L02_P009" (solid, pour order 9): 15.062,75.413 15.215,75.26 64.948,75.26 64.948,26.924 64.059,26.035 15.113,26.035
+3.3 on 3.3V "+3.3_L03_P011" (solid, pour order 11): 31.42,68.097 48.793,68.097 49.225,67.666 49.225,51.029 26.975,51.029 26.695,50.749 26.848,50.597 26.848,35.001 15.418,35.001 15.367,34.95 15.367,68.123

## Silkscreen, mask and mechanical layers (free items; w line width, h text height)
Mechanical 1:
  the board outline again, w0.381